# Altium PCB SSB23_rev0.PcbDoc (part 2 of 3)
Units mil, origin at the board's own origin, x right, y up, seen from the top; angles counter-clockwise.
Board outline 4555 x 3775 mil, 2 copper layers (Top Layer, Bottom Layer); 91 components, 73 nets, 352 pads, 879 vias.
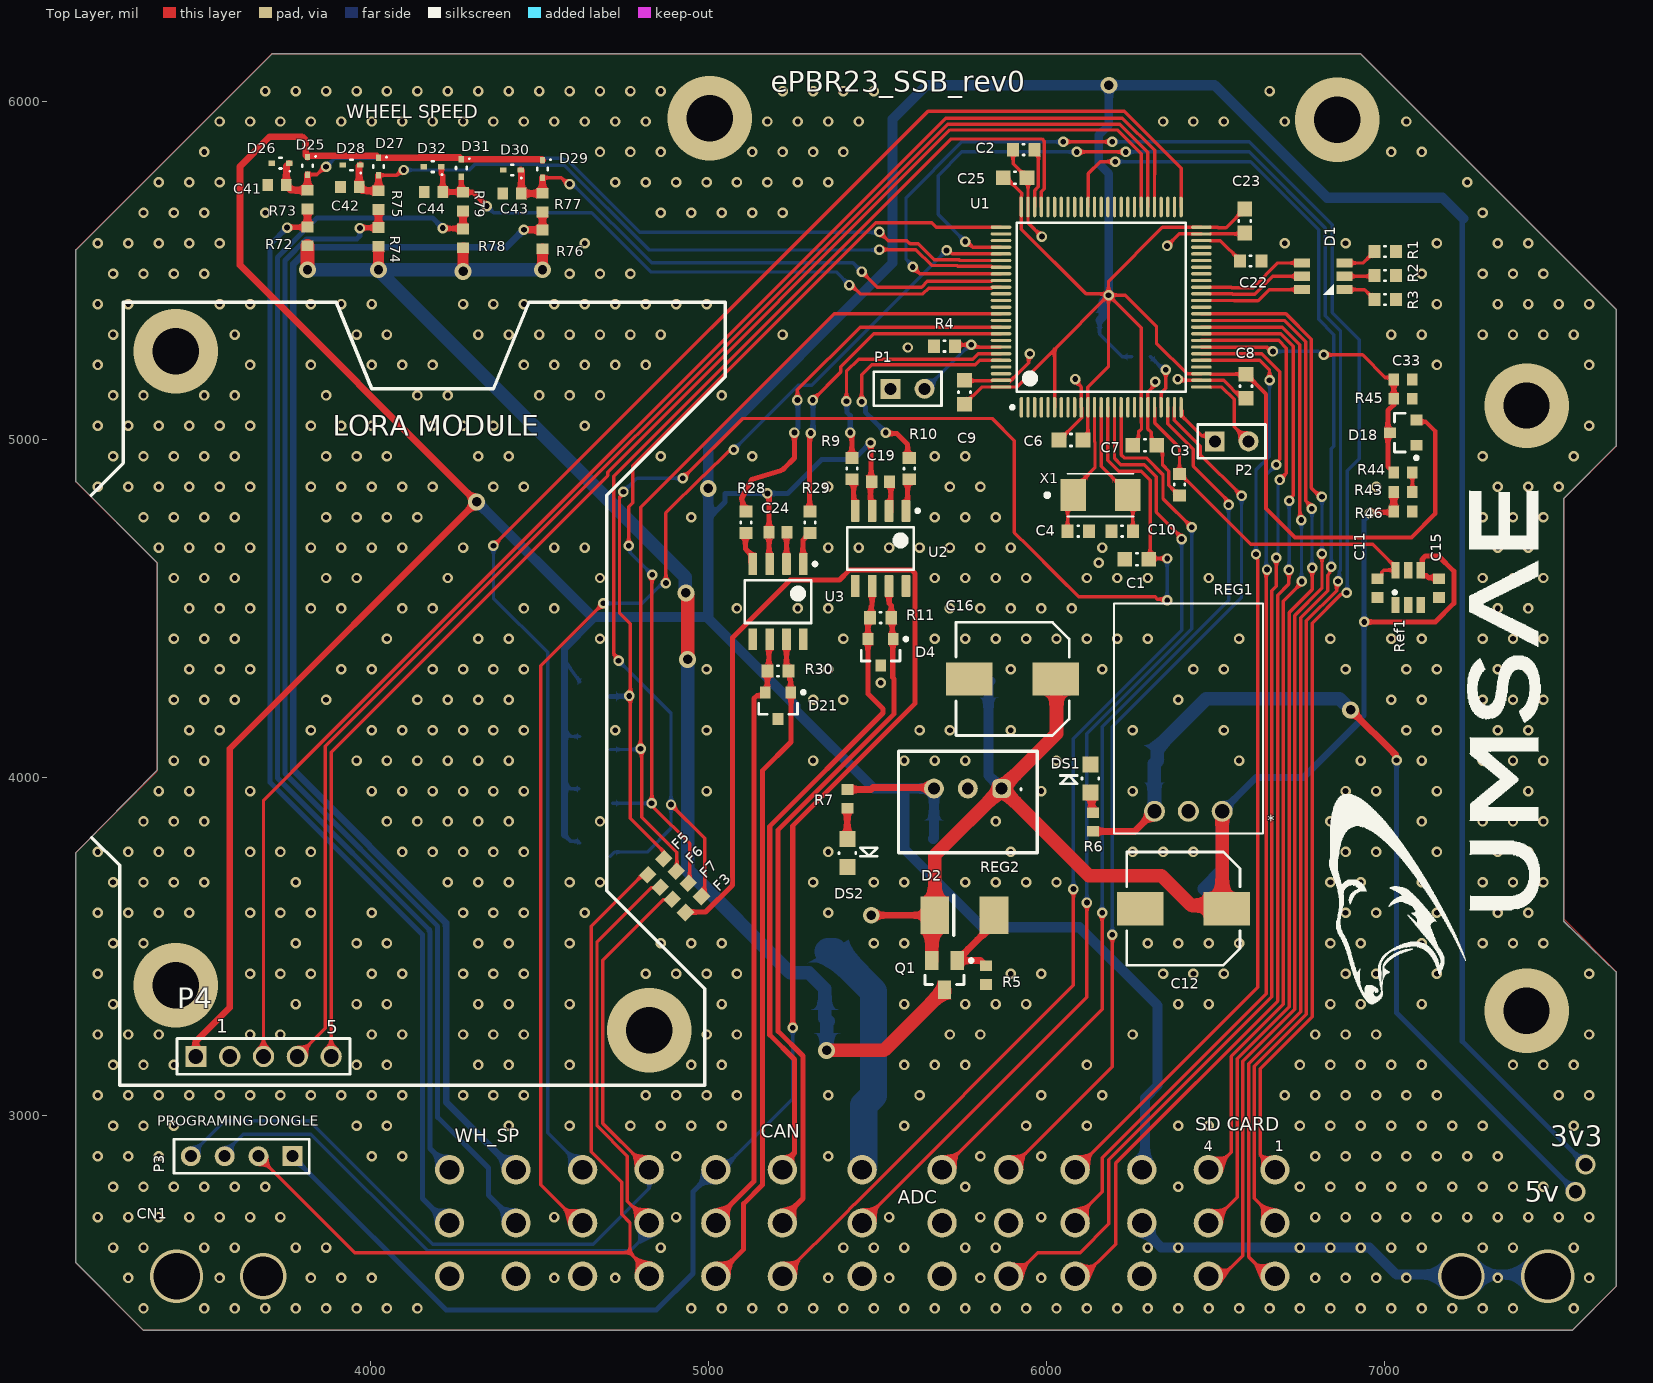
[diagram p0: Top Layer view]

## Via types
v1: diameter 31, hole 17, Top Layer to Bottom Layer, 854 vias
v2: diameter 50, hole 28, Top Layer to Bottom Layer, 12 vias
v3: diameter 250, hole 137, Top Layer to Bottom Layer, 7 vias
v4: diameter 157.48, hole 137.8, Top Layer to Bottom Layer, 2 vias
v5: diameter 137.8, hole 118.11, Top Layer to Bottom Layer, 2 vias
v6: diameter 59.06, hole 39.37, Top Layer to Bottom Layer, 2 vias

## Nets (pads, with @x,y where several pads share a name; then routed paths per layer and width w, separated by ;. In a path a pad name is that pad's centre, name@x,y a point inside that pad or via, vN(x,y) a via of type N, cw(c..) or ccw(c..) an arc to the next point about the centre after c; other vN are vias at no path point) (continued)
3v3: (continued)
  Bottom Layer w15: 5000,4765 5050,4815 5050,4840 v1(5175,4840) 5235,4840 5335,4940 5409.21,4940 5430,4940 v1(5480,4990) ; 7230,5650 7230,3220 v6(7595,2855)
  Bottom Layer w20: 4575,3830 4575,3985 4575,4140 4575,4346 4575,4380 4660,4465
  Bottom Layer w25: C5.2@6157.48,5352.36 6166.63,5361.52 6166.63,5407.53 6183.9,5424.79 v1(6183.9,5426.42) 6185.04,5427.56 6185.04,5785.47 6155,5815.51 6155,5900 6185.04,5930.04 v2(6185.04,6047.24)
  Bottom Layer w30: v2(4315,4815) 4317.1,4815 4657.1,4475 5000,4475 ; 5580,3961.89 5580,3788.49 5811.23,3557.27 6097.47,3557.27 6328.69,3326.04 6328.69,3088.91 6292.24,3052.46 6292.24,2850 CN1.7@6282.24,2840 ; C18.2@5665.35,3818.9 5667.72,3821.26 REG2.3@5667.72,3967.32 5489.17,3967.32 5257.5,4199 5257.5,4212.97 5000,4470.47 5000,4475 ; 7232.91,5652.91 7171.26,5714.57 6830.43,5714.57 6497.76,6047.24 v2(6185.04,6047.24) 5645.67,6047.24 5545,5946.57 5545,5521.38 5000,4976.38 v2(5000,4855) 5000,4765 5000,4475
3v3ref: C3.2 C11.2 Ref1.6 U1.21 | length 1036.7
  Top Layer w10: U1.21@6319.72,5094.72 6319.72,5094.65 6320.87,5093.5 6320.94,5093.43 6320.94,5048.39 6393.7,4975.63 C3.2@6393.7,4897.64 6395.67,4897.64 6603.8,4689.51 6965.2,4689.51 Ref1.6@7023.22,4631.5 ; C11.2@6979.28,4587.56 6981.25,4587.56 6992,4598.31 6992,4607.29 6997.86,4613.15 Ref1.6@7032.6,4613.15
5v: C14.2 R6.1 REG1.3 | length 2745.4
  Top Layer w20: R6.1@6137.96,3840.55 6260.55,3840.55 REG1.3@6320,3900 ; v2(6900,4200) 7033.6,4066.4 7033.6,4053.42 v1(7035.71,4051.31)
  Bottom Layer w15: v1(7035.71,4051.31) 7035.71,3304.29 v6(7565,2775)
  Bottom Layer w40: REG1.3@6320,3900 6319.49,3900.51 6319.49,4039.49 C14.2@6318.98,4040 6328.5,4049.53 6328.5,4088.5 6473.43,4233.43 6866.57,4233.43 v2(6900,4200)
ADC123_IN0: CN1.16 U1.23 | length 2680.3
  Top Layer w10: CN1.16@5691.69,2840 5691.69,2841.69 6165,3315 v1(6165,3600) ; U1.23@6359.09,5094.72 6359.09,5069.29 6358.86,5069.06 6358.86,5046.22 6433.86,4971.22 6433.86,4921.14 6534.84,4820.16 6534.84,4810.24 v1(6538.86,4806.22)
  Bottom Layer w10: v1(6165,3600) 6165,4150 6538.86,4523.86 v1(6538.86,4806.22)
ADC123_IN1: CN1.13 U1.24 | length 2586.2
  Top Layer w10: CN1.13@5915,2865 6195,3145 v1(6195,3535) ; U1.24@6378.78,5094.72 6378.78,5056.22 6455,4980 6455,4955 v1(6577.25,4832.75)
  Bottom Layer w10: v1(6195,3535) 6195,4150.49 6577.25,4532.75 v1(6577.25,4832.75)
ADC123_IN5: CN1.10 U1.30 | length 2815.5
  Top Layer w10: CN1.10@6085.39,2840 6625,3379.61 6625,4643.64 6624.02,4644.62 6624.02,4655.98 v1(6620,4660) ; U1.30@6458.5,5233.5 6631.5,5233.5 6660,5205 v1@6660,5180
  Bottom Layer w10: v1(6620,4660) 6620,4910 6660,4950 v1(6660,5175)
ADC123_IN6: CN1.11 U1.31 | length 2990
  Top Layer w10: CN1.11@6100,2710 6165,2775 6165,2875 6650,3360 6650,4612.5 v1(6652.5,4615) ; U1.31@6458.5,5253.19 6636.81,5253.19 6690,5200 6690,4940.68 6680,4930.68 v1(6680,4925)
  Bottom Layer w10: v1(6652.5,4615) 6650,4617.5 6650,4747.84 6650,4895 v1(6680,4925)
ADC123_IN10: CN1.24 U1.15 | length 3166.2
  Top Layer w10: CN1.24@5230,2535 5400.17,2705.17 5400.17,2705.43 5432.56,2737.83 5432.83,2737.83 6080,3385 v1(6080,3670) ; U1.15@6201.61,5094.72 6201.61,4943.39 6220,4925 6290,4925 6325,4890 6325,4785 v1@6402.5,4707.5
  Bottom Layer w10: v1(6080,3670) 6080,4115 6400,4435 v1(6400,4705)
ADC123_IN11: CN1.20 U1.16 | length 2909.8
  Top Layer w10: CN1.20@5475,2705 6120,3350 v1(6120,3630) ; U1.16@6221.3,5094.72 6221.3,4953.7 6230,4945 6295,4945 6345,4895 6345,4825 v1(6430,4740)
  Bottom Layer w10: v1(6120,3630) 6120,4130 6430,4440 v1(6430,4740)
ADC123_IN14: CN1.15 U1.33 | length 3391.3
  Top Layer w10: CN1.15@5920,2540 5975,2595 6100,2595 6185,2680 6185,2870 6667,3352 6667,4552 6680,4565 v1(6680,4650) ; U1.33@6458.5,5292.56 6687.44,5292.56 6710,5270 6710,4900 v1(6690,4880)
  Bottom Layer w10: v1(6680,4650) 6684.02,4654.02 6684.02,4665.38 6685,4666.36 6685,4863.64 6685.98,4864.62 6685.98,4875.98 v1(6690,4880)